# Altium PCB Telephone Circuit v1.0.PcbDoc (part 1 of 5)
Units mil, origin at the board's own origin, x right, y up, seen from the top; angles counter-clockwise.
Board outline 3149.61 x 2952.76 mil, 2 copper layers (Top Layer, Bottom Layer), stack 61.855 mil thick; 194 components, 119 nets, 557 pads, 213 vias.
Unrouted connection lines stored in the file: 77.
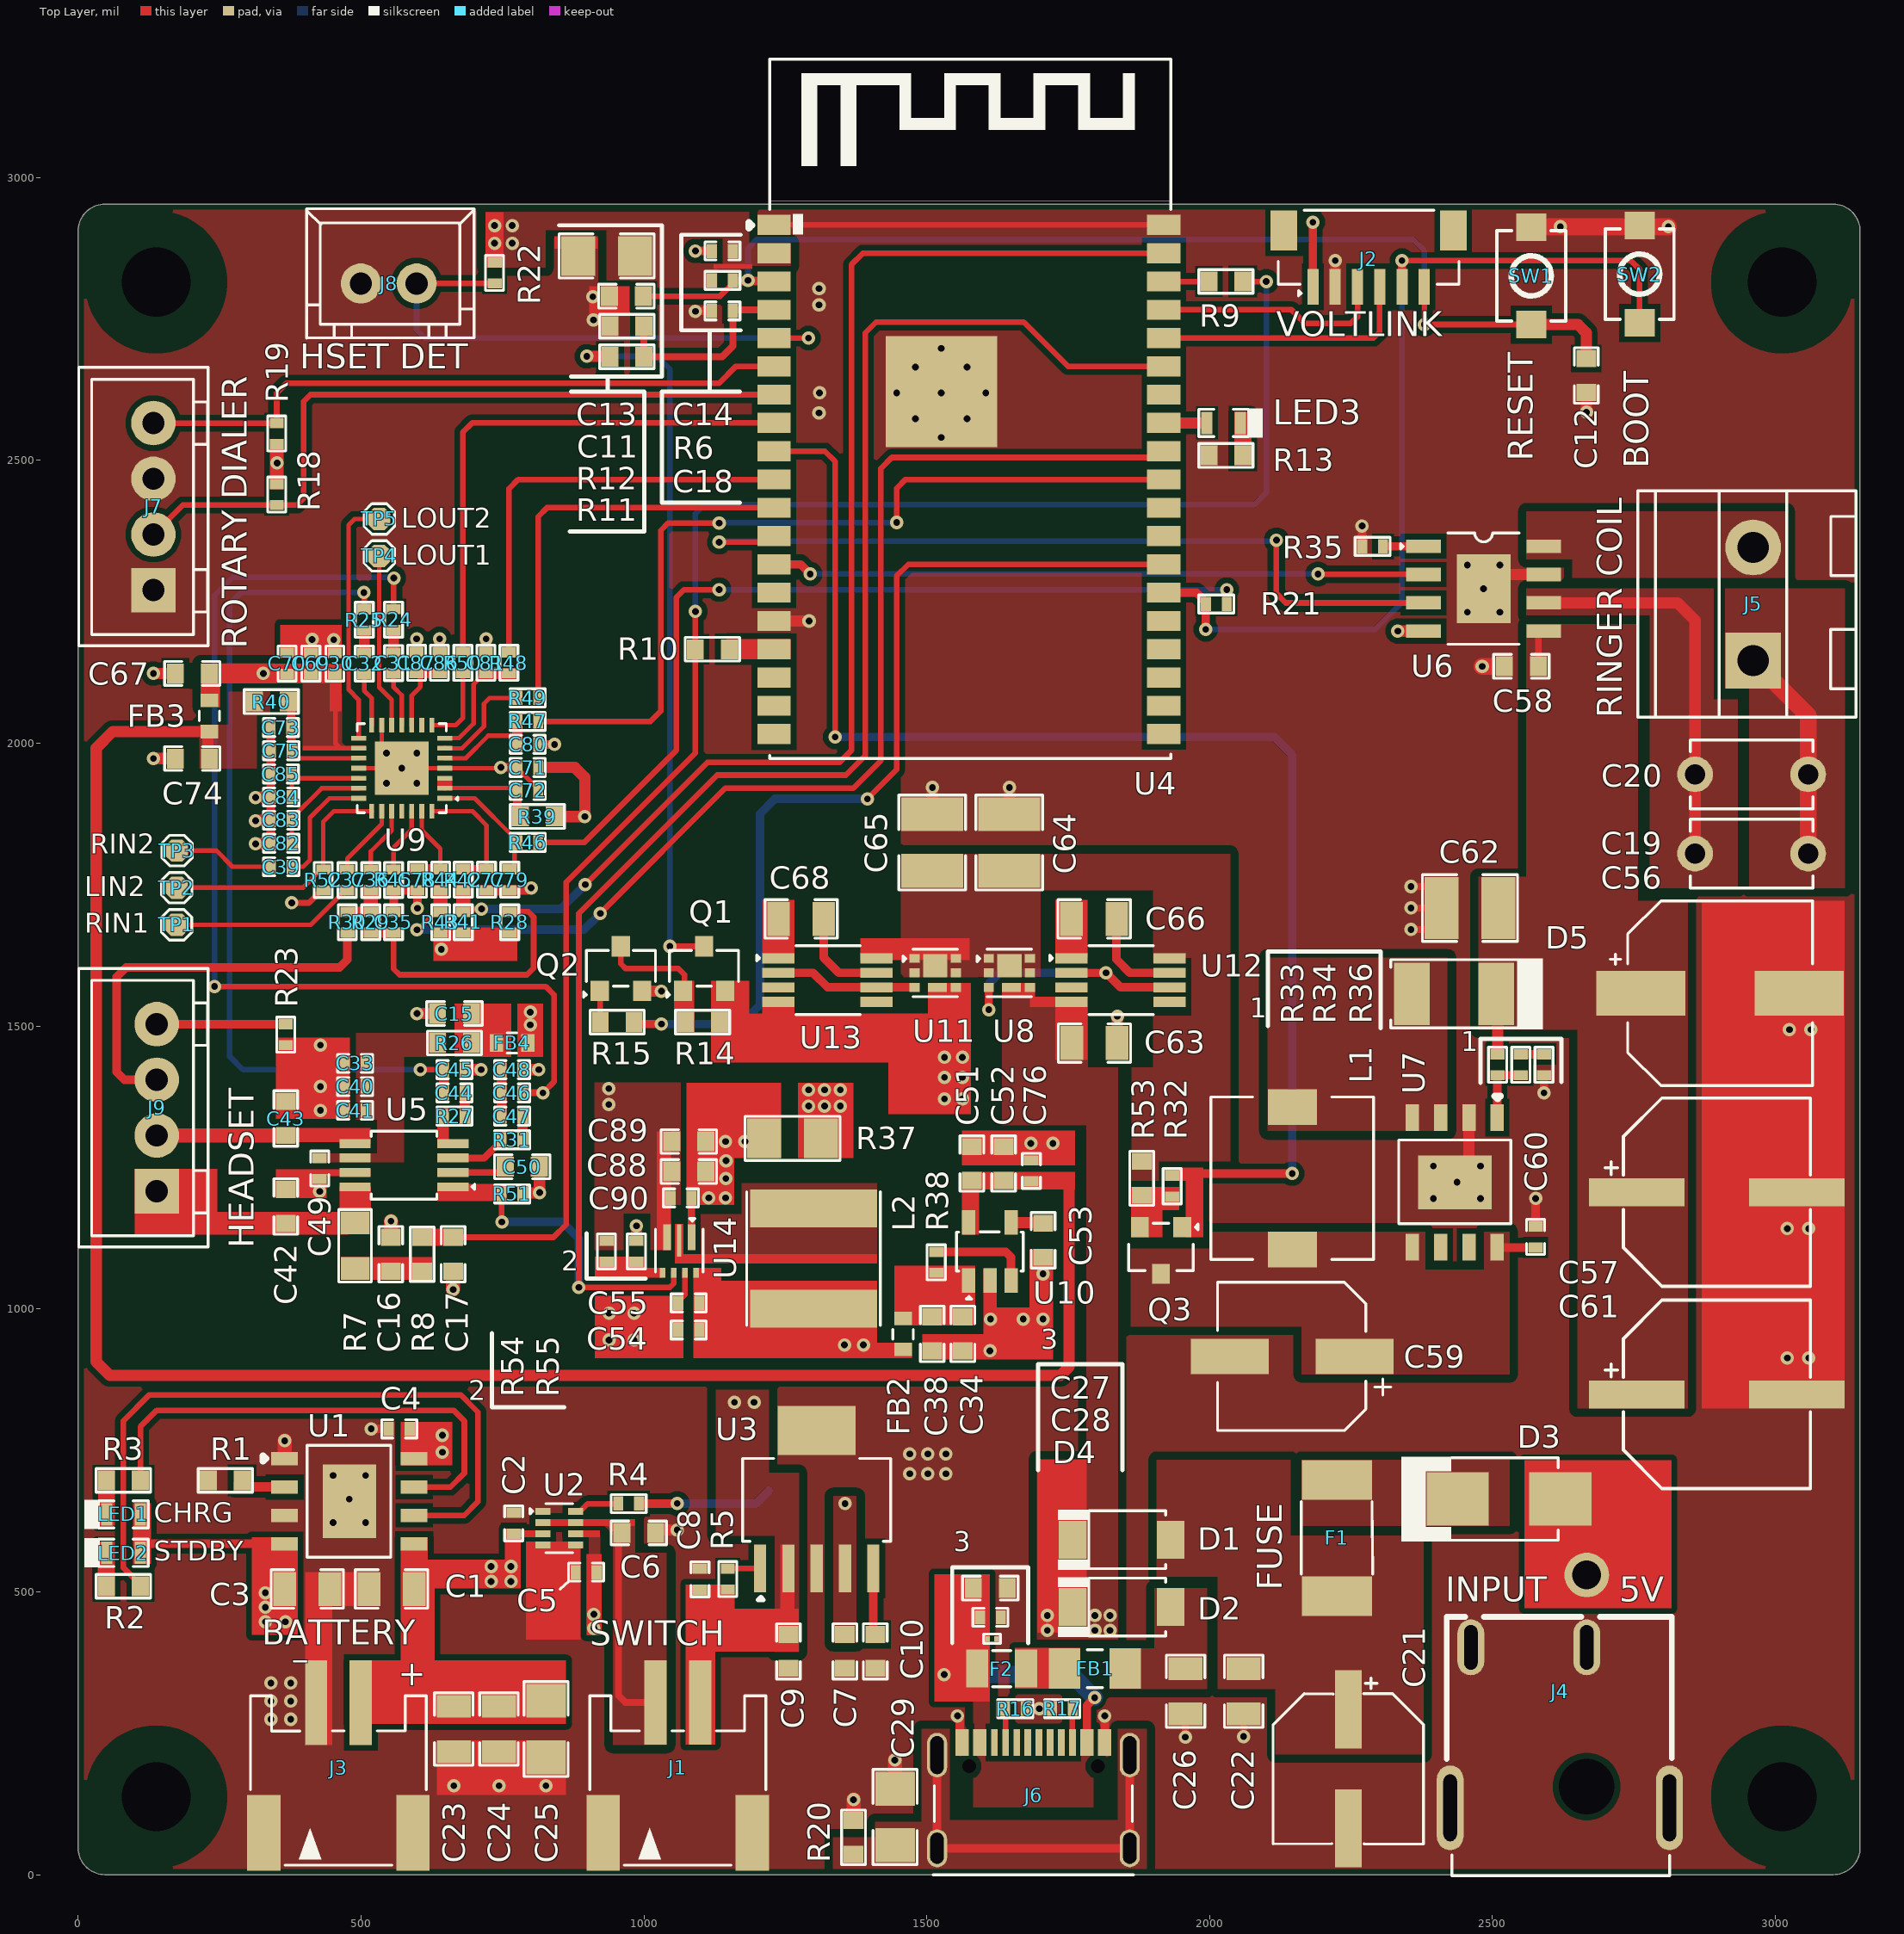
[diagram p0: Top Layer view]
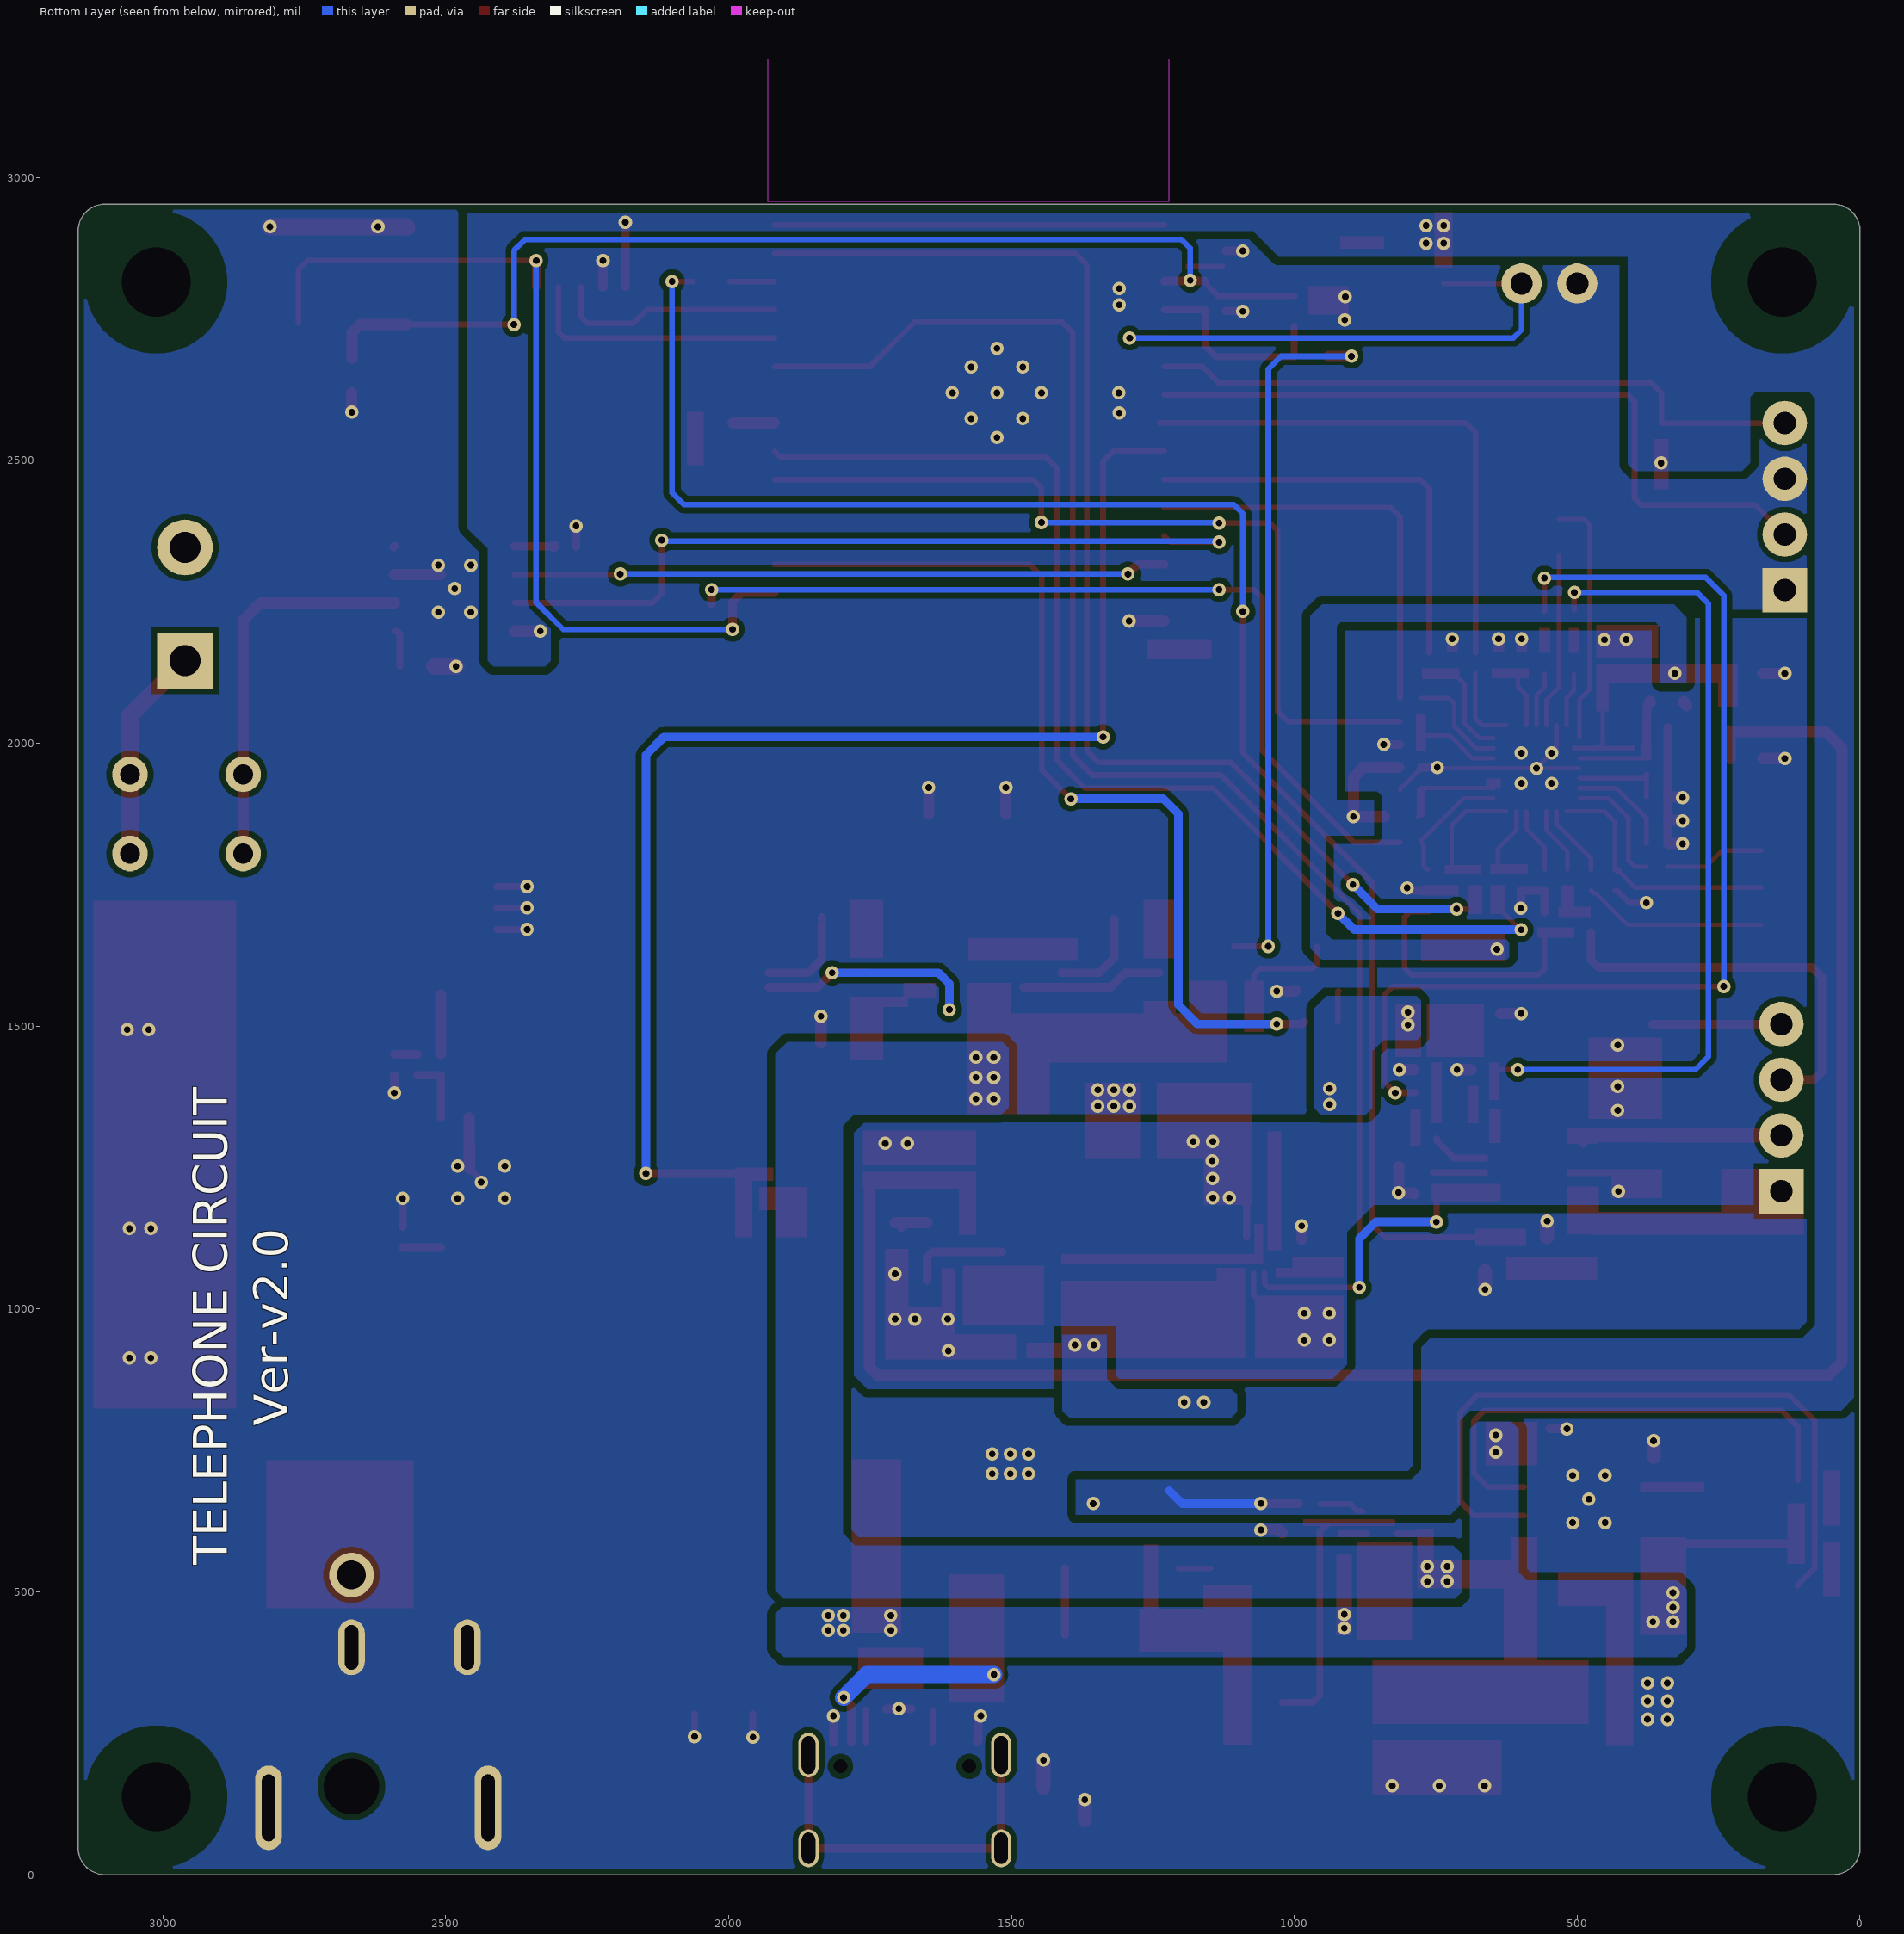
[diagram p1: Bottom Layer view, seen from below]
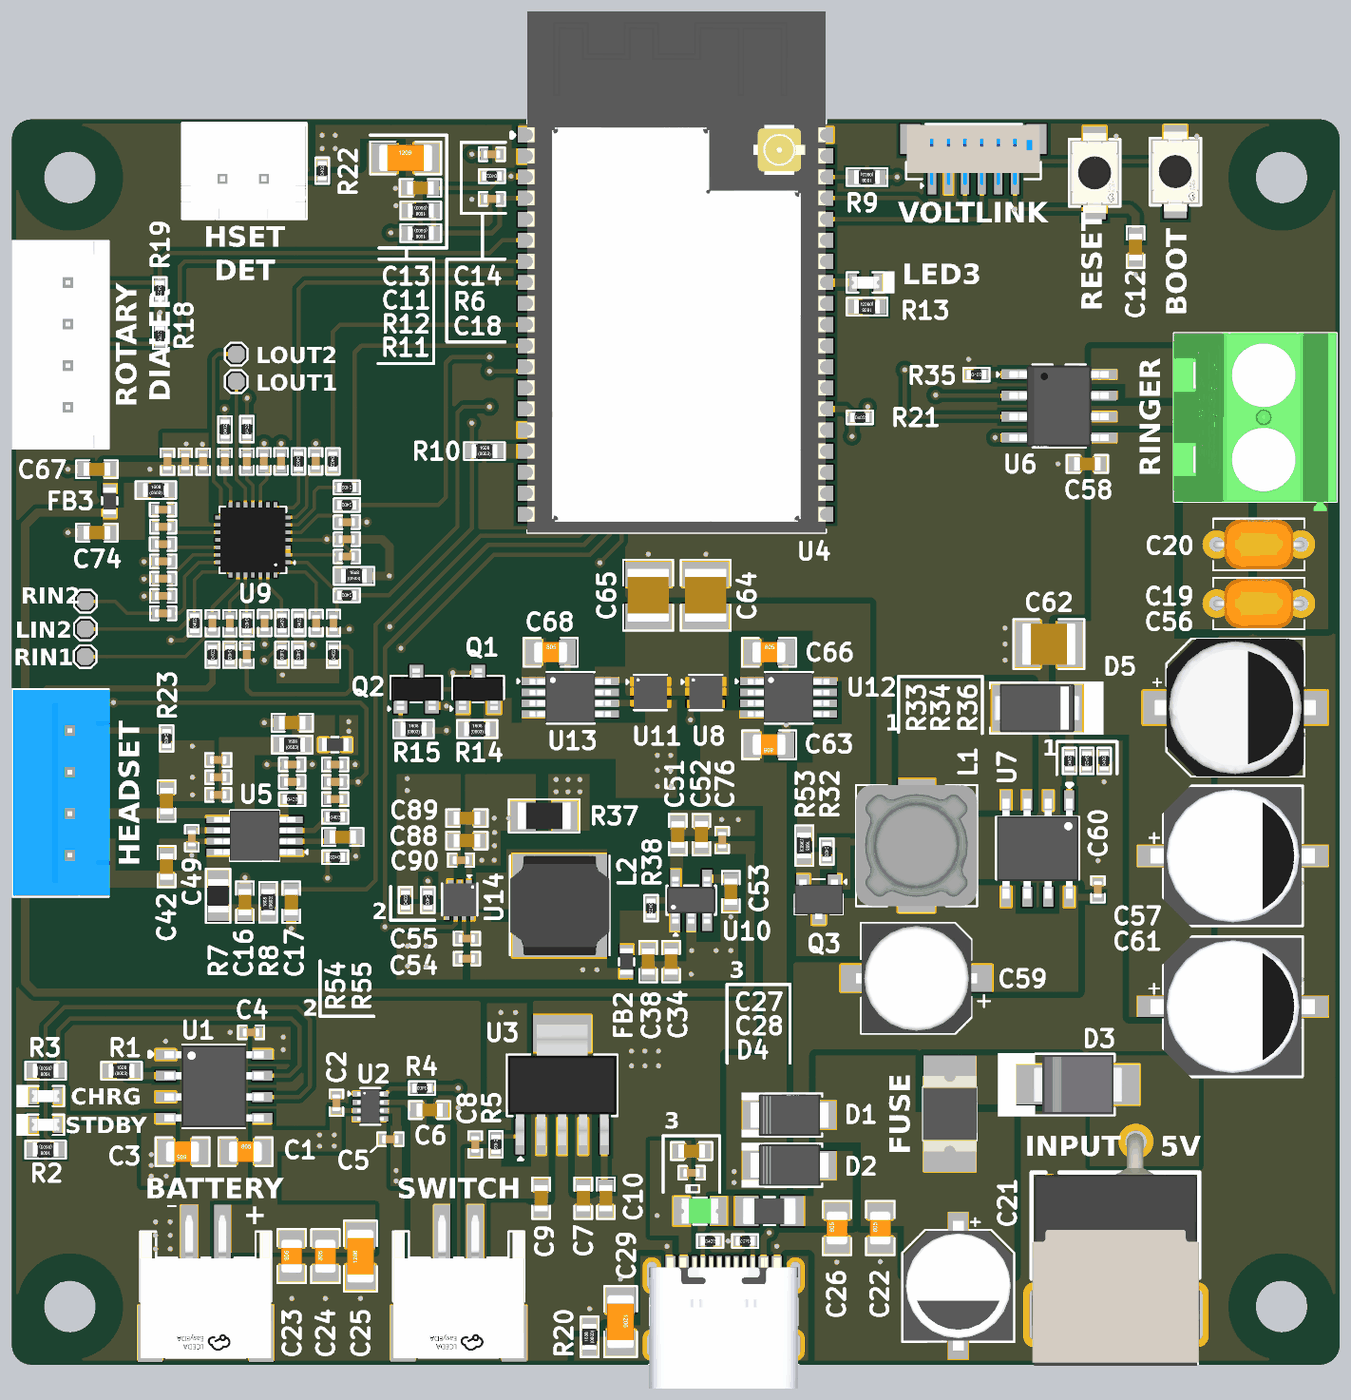
[diagram p4: 3D render of the assembled board from above, using the file's embedded part models]

## Layer stack, top to bottom
Top Solder: solder mask 0.4, Solder Resist, Dk 3.5
Top Layer: signal copper 1.4
Dielectric 1: dielectric 59.0551, FR-4, Dk 4.8
Bottom Layer: signal copper 1.4
Bottom Solder: solder mask 0.4, Solder Resist, Dk 3.5

## Board outline
0,47.24 0,2905.51 cw(c47.24,2905.51) 47.24,2952.76 3102.36,2952.76 cw(c3102.36,2905.51) 3149.61,2905.51 3149.61,47.24 cw(c3102.36,47.24) 3102.36,0 47.24,0 cw(c47.24,47.24)

## Design rules (kind name [scope] priority, off if disabled: settings)
BoardOutlineClearance [All] p1: gap=0 ignorepadtopadclearanceinfootprint=FALSE except(10: Poly-OutlineEdge)
Clearance [All] p1: gap=10 ignorepadtopadclearanceinfootprint=TRUE except(6: Track-SMDPad; 7: Arc-Track Arc-SMDPad Arc-Fill Track-Track Track-Fill SMDPad-SMDPad SMDPad-Fill Via-Fill Fill-Fill; 15: Poly-Poly; 20: Poly-Region)
ComponentClearance [All] p1: gap=0 collisioncheckmode=3 verticalgap=0 showdistances=FALSE
HoleSize [All] p1: absolutevalues=TRUE maxlimit=150 minlimit=1 maxpercent=80.000 minpercent=20.000
MinimumSolderMaskSliver [All] p1: minsoldermaskwidth=0
PolygonConnect [All] p1: connectstyle=Direct reliefconductorwidth=10 reliefentries=4 polygonreliefangle="90 Angle" airgapwidth=10
RoutingVias [All] p1: holewidth=11.81 width=23.62 viastyle="Through Hole" minholewidth=11.81 minwidth=23.62 maxholewidth=11.81 maxwidth=23.62
SilkToSilkClearance [All] p1: silktosilkclearance=0
SilkToSolderMaskClearance [IsPad] p1: minsilkscreentomaskgap=0 clearancetoexposedcopper=TRUE
SolderMaskExpansion [All] p1: expansion=4 istentingtop=FALSE
SupplyNets "Schematic Supply Nets_15" [InNet('AGND')] p1: voltage=0.000
SupplyNets "Schematic Supply Nets_14" [InNet('DC_Barrel_5V')] p2: voltage=0.000
SupplyNets "Schematic Supply Nets_13" [InNet('V_OR')] p3: voltage=0.000
SupplyNets "Schematic Supply Nets_12" [InNet('GND')] p4: voltage=0.000
SupplyNets "Schematic Supply Nets_11" [InNet('VUSB')] p5: voltage=0.000
SupplyNets "Schematic Supply Nets_10" [InNet('BATT')] p6: voltage=0.000
SupplyNets "Schematic Supply Nets_9" [InNet('5V_BOOST#')] p7: voltage=0.000
SupplyNets "Schematic Supply Nets_8" [InNet('V_MON')] p8: voltage=0.000
SupplyNets "Schematic Supply Nets_7" [InNet('Coil power_42V')] p9: voltage=0.000
SupplyNets "Schematic Supply Nets_6" [InNet('3.3V##')] p10: voltage=0.000
SupplyNets "Schematic Supply Nets_5" [InNet('LDO_INPUT')] p11: voltage=0.000
SupplyNets "Schematic Supply Nets_4" [InNet('5V')] p12: voltage=0.000
SupplyNets "Schematic Supply Nets_3" [InNet('5V_BOOST')] p13: voltage=0.000
SupplyNets "Schematic Supply Nets_2" [InNet('3V3')] p14: voltage=0.000
SupplyNets "Schematic Supply Nets_1" [InNet('VBUS')] p15: voltage=0.000
SupplyNets "Schematic Supply Nets" [InNet('3V3#')] p16: voltage=0.000
Width [All] p1: maxlimit=50 minlimit=8 preferedwidth=12 minimp=50.000000 maximp=50.000000 favimp=50.000000
25 further rules are at their usual default settings.

## Classes and differential pairs
component class Ringer_Sheet: C56 C57 C58 C59 C60 C61 C62 C63 C64 C65 C66 C68 D5 L1 Q3 R32 R33 R34 R35 R36 R53 U6 U7 U8 U11 U12 U13
component class Power_Sheet: C1 C2 C3 C4 C5 C6 C7 C8 C9 C10 D1 D2 J1 LED1 LED2 R1 R2 R3 R4 R5 U1 U2 U3
component class Controller_Sheet: BOOT C11 C12 C13 C14 C16 C17 C18 J2 LED3 Q1 Q2 R6 R7 R8 R9 R10 R11 R12 R13 R14 R15 R21 RESET SW1 SW2 U4
component class Connector_Sheet: C19 C20 C21 C22 C23 C24 C25 C26 C27 C28 C29 D3 D4 F1 F2 FB1 J3 J4 J5 J6 J7 J8 J9 R16 R17 R18 R19 R20 R22 R23
component class "Audio Codec_Sheet": C30 C31 C32 C34 C35 C36 C37 C38 C39 C51 C52 C53 C67 C69 C70 C71 C72 C73 C74 C75 C76 C77 C78 C79 C80 C81 C82 C83 C84 C85 C86 C87 FB2 FB3 R24 R25 R28 R29 R30 R37 R38 R39 R40 R41 R42 R43 R44 R45 R46 R47 R48 R49 R50 R52 TP1 TP2 TP3 TP4 TP5 U9 U10
component class "Audio Amplifier_Sheet": C15 C33 C40 C41 C42 C43 C44 C45 C46 C47 C48 C49 C50 C54 C55 C88 C89 C90 FB4 L2 R26 R27 R31 R51 R54 R55 U5 U14

## Components (designator, comment, footprint, x,y, rotation, side; value= is the part's Value field where it differs from the comment)
C1 "10uF" Cap-0805 554,505 r0 top
C2 "100nF" Cap-0402 769.88,621.08 r270 top
C3 "10uF" Cap-0805 404.98,505 r180 top
C4 "100nF" Cap-0402 567.5,788 r0 top
C5 "100nF" Cap-0402 897.85,534.7 r0 top
C6 "1uF" Cap-0603 991,604 r180 top
C7 "22uF" Cap-0603 1355.36,394.62 r90 top
C8 "2.2uF" Cap-0402 1099.26,522.2 r270 top
C9 "10uF" Cap-0603 1255.36,394.61 r90 top
C10 "10nF" Cap-0603 1408.95,394.61 r90 top
C11 "1uF" Cap-0603 969,2790.15 r0 top
C12 "100nF" Cap-0603 2665.63,2649.96 r90 top
C13 "100uF" Cap-1206 934,2861.43 r0 top
C14 "100nF" Cap-0402 1138.75,2870.15 r0 top
C15 "1uF" Cap-0603 665.12,1522.16 r0 top
C16 "100nF" Cap-0603 552.67,1096.7 r270 top
C17 "100nF" Cap-0603 662.61,1096.7 r90 top
C18 "100nF" Cap-0402 1138.75,2764.15 r0 top
C19 "2.2uF" CD2A225KC9BER1F100 2957.96,1804.88 r0 top
C20 "1uF" CD2E105KC1IER1I100 2957.96,1944.88 r0 top
C21 "220uF" 189RV0019 2245,187 r270 top
C22 "1uF" Cap-0805 2060,324.12 r90 top
C23 "10uF" Cap-0805 663.86,257.4 r90 top
C24 "10uF" Cap-0805 743.86,257.4 r90 top
C25 "100uF" Cap-1206 827,257.41 r90 top
C26 "10uF" Cap-0805 1957.48,324.12 r90 top
C27 "10nF" Cap-0603 1612.35,506.46 r0 top
C28 "1uF" Cap-0402 1612.35,455 r0 top
C29 "4.7nF" Cap-1206 1443.95,102.05 r270 top
C30 "100nF" Cap-0402 453.67,2141.02 r270 top
C31 "22uF" Cap-0402 557.66,2141.52 r90 top
C32 "22uF" Cap-0402 505.67,2141.02 r90 top
C33 "10uF" Cap-0402 489.53,1434.02 r180 top
C34 "0.1uF" Cap-0603 1563.8,955.87 r90 top
C35 "10uF" Cap-0402 557.67,1683.52 r270 top
C36 "1uF" Cap-0402 517.19,1758.08 r90 top
C37 "1uF" Cap-0402 475.58,1758.08 r90 top
C38 "10uF" Cap-0603 1509.56,955.87 r90 top
C39 "1uF" Cap-0402 359,1781.58 r0 top
C40 "1uF" Cap-0402 489.53,1393.02 r180 top
C41 "100nF" Cap-0402 489.53,1351.02 r180 top
C42 "330pF" Cap-0603 367,1181.1 r90 top
C43 "330pF" Cap-0603 366.99,1336.59 r90 top
C44 "100nF" Cap-0402 665.12,1381.99 r180 top
C45 "39pF" Cap-0402 665.1,1422.99 r180 top
C46 "22uF" Cap-0402 766.99,1382 r180 top
C47 "100nF" Cap-0402 767,1341 r180 top
C48 "39pF" Cap-0402 766.98,1423 r180 top
C49 "1uF" Cap-0402 427,1248.2 r90 top
C50 "1uF" Cap-0603 785,1251.2 r180 top
C51 "0.1uF" Cap-0603 1579.82,1256.95 r270 top
C52 "10uF" Cap-0603 1635.82,1256.96 r270 top
C53 "22nF" Cap-0603 1705.56,1121.44 r90 top
C54 "10uF" Cap-0402 1079.3,962.84 r0 top
C55 "100nF" Cap-0402 1079.3,1010.52 r0 top
C56 "47uF" EEEFN1K470UP 2902.15,1558 r0 top
C57 "100uF" VKMD1451K101MV 2754.81,1206.39 r0 top
C58 "0.1uF" Cap-0603 2551,2135.85 r0 top
C59 "330uF" GVT1C331M0607 2146,916 r180 top
C60 "4.7uF" Cap-0402 2576.21,1127.12 r270 top
C61 "100uF" VKMD1451K101MV 2754.81,848.89 r0 top
C62 "10uF" Cap-1210 2460,1708.64 r0 top
C63 "100pF" Cap-0805 1796.41,1470 r180 top
C64 "10uF" Cap-1210 1645.87,1824.45 r270 top
C65 "10uF" Cap-1210 1509.56,1824.45 r270 top
C66 "2.2uF" Cap-0805 1795.77,1689.24 r0 top
C67 "4.7uF" Cap-0603 201.73,2123.35 r0 top
C68 "2.2uF" Cap-0805 1277.98,1689.24 r0 top
C69 "100nF" Cap-0402 411.28,2141.02 r270 top
C70 "100nF" Cap-0402 369.28,2141.02 r270 top
C71 "10uF" Cap-0402 794.64,1957.23 r0 top
C72 "100nF" Cap-0402 794.64,1916.36 r180 top
C73 "10uF" Cap-0402 358.52,2027.68 r180 top
C74 "10uF" Cap-0603 201.73,1972.93 r180 top
C75 "100nF" Cap-0402 359.01,1986.9 r180 top
C76 "100nF" Cap-0402 1684.82,1243.96 r90 top
C77 "20pF" Cap-0402 721.81,1758.55 r90 top
C78 "20pF" Cap-0402 599.62,1758.54 r90 top
C79 "20pF" Cap-0402 762.92,1758.51 r90 top
C80 "20pF" Cap-0402 794.64,1997.88 r180 top
C81 "20pF" Cap-0402 720.66,2142.03 r270 top
C82 "10uF" Cap-0402 359,1823 r0 top
C83 "100nF" Cap-0402 359,1863.93 r0 top
C84 "10uF" Cap-0402 359,1904.87 r0 top
C85 "100nF" Cap-0402 358.52,1945.8 r0 top
C86 "10uF" Cap-0402 638.66,2142.03 r270 top
C87 "100nF" Cap-0402 598.1,2142.03 r270 top
C88 "22uF" Cap-0603 1079.41,1242.89 r180 top
C89 "22uF" Cap-0603 1079.41,1296 r180 top
C90 "100nF" Cap-0402 1065.41,1196.37 r180 top
D1 "PMEG3030EP,115" SOD-128 1844.39,592 r0 top value=470pF
D2 "PMEG3030EP,115" SOD-128 1844.39,473 r0 top value=470pF
D3 "SS510B" SMB_ 2529,664 r180 top
D4 "PESD5V0H1BSFYL" DSN0603-2 1615.35,417.12 r0 top
D5 "SS26" SMA(DO-214AC) 2432,1557 r180 top
F1 "BSMD1812-260-13.2V" 1812-FUSE 2225,595 r270 top
F2 "BSMD0805L-200" Fuse-0805 1632.3,364.12 r0 top
FB1 "100MHz" IND-1206 1797.14,364.12 r0 top
FB2 "BLM18SG121TN1D" "IND-0603 (1608 Metric)" 1458,955.87 r270 top
FB3 "BLM18SG121TN1D" "IND-0603 (1608 Metric)" 231.96,2048.09 r90 top
FB4 "BLM18PG181SN1D" "IND-0603 (1608 Metric)" 767,1470.16 r180 top
J1 "S2B-PH-SM4-TB(LF)(SN)" S2B-PH-SM4-TB(LF)(SN) 1059.89,189.16 r0 top locked
J2 "Voltlink Target" "Voltlink Target" 2280.91,2856.4 r0 top
J3 "S2B-PH-SM4-TB(LF)(SN)" S2B-PH-SM4-TB(LF)(SN) 460,189 r0 top locked
J4 "DC-044K-D025" DC-044K-D025 2619,324 r90 top
J5 "1715721" 1715721 2960.66,2246.06 r90 top
J6 "TYPE-C-31-M-12" TYPE-C-31-M-12_ 1688.48,140.12 r0 top locked
J7 "XH-4A" XH-4A 133,2418.21 r90 top
J8 "XH-2A-L" XH-2A-L 549.01,2812.69 r0 top locked
J9 "XH-4A-L" XH-4A-L 139,1355.79 r90 top locked
L1 "4.7uH" YPRH0704-4R7M 2146,1231 r270 top
L2 "1uH" MPIT6045-1R0N-LF 1299.79,1088.85 r90 top
LED1 "RED" LED-0603 80,636.82 r180 top
LED2 "Emerald" LED-0603 80,568.82 r180 top
LED3 "RED" LED-0603 2024.69,2566.15 r0 top
Q1 "AO3407" SOT-23 1106.31,1601.5 r0 top
Q2 "MMBT2222A-7-F" SOT-23 959.28,1601.5 r0 top
Q3 "SSM3J328R,LF" SOT-23F 1914,1103.34 r180 top
R1 "1.2K" Res-0603 260,696.81 r180 top value=1.2kΩ
R2 "330R" Res-0603 80,509.82 r0 top
R3 "330R" Res-0603 80,696.82 r0 top
R4 "10K" Res-0402 973,655.85 r180 top
R5 "10K" Res-0402 1148.21,522.6 r270 top
R6 "10K" Res-0402 1138.75,2818.15 r180 top
R7 "10K" RES-0805 489.39,1111.7 r90 top
R8 "1K" Res-0603 608,1096.7 r270 top value=1kR
R9 "1K" Res-0603 2028.69,2816.15 r0 top value=1kR
R10 "1K" Res-0603 1121,2166.15 r180 top value=1kR
R11 "100K" Res-0603 970,2683.17 r0 top
R12 "270K" Res-0603 970,2737 r0 top value=270kR
R13 "100R" Res-0603 2028.69,2508.76 r0 top
R14 "1K" Res-0603 1103.71,1507.13 r180 top
R15 "1K" Res-0603 952.78,1507.13 r180 top
R16 "5.1K" Res-0402 1656.48,293.12 r0 top
R17 "5.1K" Res-0402 1739.5,293.12 r180 top
R18 "10K" Res-0402 351.01,2439.58 r90 top
R19 "10K" Res-0402 351.01,2547.35 r270 top
R20 "1M" Res-0603 1370.51,66.05 r270 top
R21 "0R" Res-0402 2011.69,2246.15 r0 top
R22 "10K" Res-0402 736,2831.19 r90 top
R23 "0R" Res-0402 366.99,1484.93 r270 top
R24 "33R" Res-0402 557.66,2218.53 r90 top
R25 "33R" Res-0402 505.67,2218.03 r90 top
R26 "10R" Res-0603 665.14,1470.16 r180 top
R27 "30K" Res-0402 665.11,1341.01 r0 top value=30kR
R28 "1K" Res-0402 762.92,1683.52 r90 top
R29 "2K" Res-0402 517.18,1683.52 r270 top value=2kR
R30 "0R" Res-0402 475.85,1683.52 r90 top
R31 "30K" Res-0402 767,1299 r0 top value=30kR
R32 "10K" Res-0402 1933.55,1216.82 r270 top
R33 "240K" Res-0402 2508.98,1431.65 r90 top
R34 "6.2K" Res-0402 2550.09,1431.65 r270 top value=6.2kR
R35 "1.3K" Res-0402 2288,2347.85 r0 top
R36 "806R" Res-0402 2590.87,1431.65 r90 top
R37 "0R" Res-1206 1262.67,1301.41 r180 top value=0mR
R38 "1K" Res-0402 1516.56,1082.44 r270 top
R39 "47R" Res-0603 811.64,1870.36 r180 top
R40 "4.7R" Res-0603 341.52,2073.51 r180 top
R41 "2K" Res-0402 680.66,1683.52 r270 top value=2kR
R42 "100R" Res-0402 680.66,1758.53 r90 top
R43 "2K" Res-0402 640.77,1683.52 r270 top value=2kR
R44 "100R" Res-0402 640.77,1758.51 r90 top
R45 "10K" Res-0402 557.67,1758.1 r270 top
R46 "33R" Res-0402 794.64,1824.45 r180 top
R47 "33R" Res-0402 794.64,2038.54 r180 top
R48 "33R" Res-0402 761.4,2142.04 r270 top
R49 "33R" Res-0402 794.66,2080.03 r180 top
R50 "33R" Res-0402 679.83,2142.04 r270 top
R51 "10K" Res-0402 766.99,1203.26 r180 top
R52 "100K" Res-0402 433.27,1758.09 r90 top
R53 "0R" Res-0603 1879.91,1230.83 r90 top
R54 "732K" Res-0402 933.78,1101.84 r90 top
R55 "100K" Res-0402 986.78,1101.84 r270 top
SW1 "TS-1088-AR02016" TS-1088-AR02016 2568.4,2826.15 r270 top
SW2 "TS-1088-AR02016" TS-1088-AR02016 2760,2829.09 r270 top
TP1 "TEST POINT 0.5mm Dia" "TEST-POINT - 0.5MM" 174,1679.02 r270 top
TP2 "TEST POINT 0.5mm Dia" "TEST-POINT - 0.5MM" 174.31,1744.62 r270 top
TP3 "TEST POINT 0.5mm Dia" "TEST-POINT - 0.5MM" 174.63,1810.22 r270 top
TP4 "TEST POINT 0.5mm Dia" "TEST-POINT - 0.5MM" 532.14,2331.15 r270 top
TP5 "TEST POINT 0.5mm Dia" "TEST-POINT - 0.5MM" 532.14,2396.4 r270 top
U1 "TP4056-42-ESOP8" ESOP-8 479.49,660 r0 top locked
U2 "LM66200DRLR" SOT-583 850.39,612.43 r0 top locked
U3 "TPS79633DCQR" SOT-223-6_ 1305.36,663.15 r0 top
U4 "ESP32-WROVER-E-N16R8" ESP32-WROVER-E-N16R8 1574.51,2466.15 r0 top locked
U5 "NS4150B" "8-MSOP (0.118\", 3.00mm Width)" 576,1254 r180 top locked
U6 "DRV8251ADDAR" SOPowerPAD(DDA)-8 2484.21,2273.19 r0 top
U7 "LGS6302EP" ESOP-8 2433.3,1223.72 r270 top
U8 "CSD17313Q2" CSD17313Q2 1646,1594.06 r0 top
U9 "ES8388" QFN-28-EP(4x4) 571.91,1955.79 r180 top locked
U10 "RT9193-33GB" SOT-23-5 1611.56,1101.44 r90 top
U11 "CSD17313Q2" CSD17313Q2 1514.91,1594.06 r0 top
U12 "LM74610QDGKRQ1" "8-VSSOP (5x3.1mm)" 1842.39,1581.27 r0 top
U13 "LM74610QDGKRQ1" "8-VSSOP (5x3.1mm)" 1324.59,1581.27 r0 top
U14 "TPS61022RWUR" "7-VQFN-HR (2x2)" 1062.47,1095.21 r270 top

## Footprints (in the part's own frame and the unit in brackets; to place one, negate y for a bottom-side part, rotate by r counter-clockwise, add the part's x,y. Pads: shape width x height; smd on the part's side, far side on the other; paste and mask are expansions set on the pad)
"7-VQFN-HR (2x2)" [mm]
  rect 1.15x0.35 smd: 1(-0.8,0.55) 3(-0.8,-0.55)
  rect 1.45x0.2 smd: 2(-0.65,0)
  rect 0.45x0.25 smd: 4(0.8,-0.75) 5(0.8,-0.25) 6(0.8,0.25) 7(0.8,0.75)
  silkscreen extent -1.65,-1.07 0.76,1.07, body extent -1.18,-1 0.82,1, height 1
"8-MSOP (0.118\", 3.00mm Width)" [mm]
  rect 1.4x0.4 smd: 1(-2.2,0.975) 2(-2.2,0.325) 3(-2.2,-0.325) 4(-2.2,-0.975) 5(2.2,-0.975) 6(2.2,-0.325) 7(2.2,0.325) 8(2.2,0.975)
  silkscreen extent -3.17,-1.52 1.47,1.52, body extent -2.45,-1.5 2.45,1.5, height 1.1
"8-VSSOP (5x3.1mm)" [mm]
  rect 1.45x0.45 smd mask+0.05: 1(-2.2,0.975) 2(-2.2,0.325) 3(-2.2,-0.325) 4(-2.2,-0.975) 5(2.2,-0.975) 6(2.2,-0.325) 7(2.2,0.325) 8(2.2,0.975)
  silkscreen extent -3.17,-1.55 1.47,1.55, body extent -2.45,-1.5 2.45,1.5, height 1.1
189RV0019 [mm]
  rect 3.5x1.2 smd paste+0 mask+0.051: 1(-2.67,0) 2(2.67,0)
  silkscreen extent -4.07,-3.38 3.38,3.38, body extent -3.9,-3.3 3.9,3.3, height 7.75
1812-FUSE [mm] "13.2V 2.6A 40A 800mW -40?~+85? 5.2A 10mO 2.5s 50mO 1812 Resettable Fuses ROHS"
  rect 1.78x3.15 smd mask+0.05: 1(-2.615,0) 2(2.615,0)
  silkscreen extent -1.63,-1.6 1.63,1.6, body extent -2.27,-1.62 2.27,1.62, height 0.85
1715721 [mm]
  rect 2.5x2.5 hole 1.4 paste-2539.97 mask+0.051: 1(-2.54,0)
  round 2.5 hole 1.4 paste-2539.97 mask+0.051: 2(2.54,0)
  silkscreen extent -5.08,-4.62 5.08,5.18, body extent -5.64,-4.62 5.09,5.21, height 15.2
Cap-0402 [mil]
  rect 18x25 smd mask+2.36: 1(-18.5,0) 2(18.5,0)
  silkscreen extent -31,-16 31,16, body extent -20,-10 20,10, height 19
Cap-0603 [mil]
  rect 30x35 smd mask+2.36: 1(-30,0) 2(30,0)
  silkscreen extent -49,-21 49,21, body extent -32,-16 31,16, height 34
Cap-0805 [mil] "SMD 0805"
  rect 40x60 smd mask+2.76: 1(-40,0) 2(40,0)
  silkscreen extent -64,-34 64,34, body extent -39,-25 39,25, height 30
Cap-1206 [mil] "SMD 1206"
  rect 60x70 smd: 1(-50,0) 2(50,0)
  silkscreen extent -84,-39 84,39, body extent -63,-31 63,32, height 39
Cap-1210 [mil] "SMD 1210"
  rect 60x110 smd: 1(-50,0) 2(50,0)
  silkscreen extent -84,-59 84,59, body extent -63,-49 63,49, height 39
CD2A225KC9BER1F100 [mm]
  round 1.6 hole 0.9 paste-2539.97 mask+0.051: 1(-2.54,0) 2(2.54,0)
  silkscreen extent -2.75,-1.55 2.75,1.55, body extent -2.74,-1.5 2.74,1.5, height 5.5
CD2E105KC1IER1I100 [mm]
  round 1.6 hole 0.9 paste-2539.97 mask+0.051: 1(-2.54,0) 2(2.54,0)
  silkscreen extent -2.75,-1.55 2.75,1.55, body extent -2.74,-1.5 2.74,1.5, height 5.5
CSD17313Q2 [mm] "6-WSON (2x2)"
  rect 0.455x0.4 smd paste-1: 1(-0.923,0.65) 2(-0.923,0) 3(-0.923,-0.65) 4(0.923,-0.65) 5(0.923,0) 6(0.923,0.65)
  rect 0.85x0.4 smd paste-0.05: 7(0.096,-0.65)
  rect 1.1x1.05 smd paste-0.05: 8(0,0.325)
  silkscreen extent -1.45,-1.07 1,1.07, body extent -1,-1 1,1, height 0.8
DC-044K-D025 [mm]
  oval 3.8x1.2 hole 0.6 slot 3 at 0 deg copper offset 0,0 paste-2539.97 mask+0.051: 1(-5.225,4.925)
  oval 2.5x1.2 hole 0.6 slot 2 at 0 deg copper offset 0,0.001 paste-2539.97 mask+0.051: 2(1.975,3.996)
  oval 2.5x1.2 hole 0.6 slot 2 at 0 deg copper offset 0,-0.001 paste-2539.97 mask+0.051: 3(1.975,-1.206)
  round 2 hole 1.3 paste-2539.97 mask+0.051: 4(5.225,-1.205)
  oval 3.8x1.2 hole 0.6 slot 3 at 0 deg paste-2539.97 mask+0.051: 6(-5.225,-4.925)
  round 0 hole 2.5 unplated paste-2539.97 mask+0.051: MH(-4.275,-1.205)
  silkscreen extent -8.27,-5.02 3.35,5.08, body extent -8.3,-5.03 5.7,5.07, height 7.3
DSN0603-2 [mm]
  rect 0.2x0.24 smd mask+0.055: 1(-0.2,0) 2(0.2,0)
  silkscreen extent -0.38,-0.2 0.38,0.2, body extent -0.3,-0.15 0.3,0.15, height 0.32
EEEFN1K470UP [mm]
  rect 4x2 smd: 1(-3.55,0) 2(3.55,0)
  silkscreen extent -4.93,-4.15 4.15,4.15, body extent -4.85,-4.15 4.85,4.15, height 10.2
ESOP-8 [mm]
  rect 1.2x0.6 smd: 1(-2.909,1.905) 2(-2.909,0.635) 3(-2.909,-0.635) 4(-2.909,-1.905) 5(2.909,-1.905) 6(2.909,-0.635) 7(2.909,0.635) 8(2.909,1.905)
  rect 2.4x3.3 smd: 9(0,0)
  silkscreen extent -3.88,-2.51 1.85,2.51, body extent -3,-2.45 3,2.45, height 1.75
ESP32-WROVER-E-N16R8 [mm]
  rect 1.5x0.9 smd: 1(-8.75,11.43) 2(-8.75,10.16) 3(-8.75,8.89) 4(-8.75,7.62) 5(-8.75,6.35) 6(-8.75,5.08) 7(-8.75,3.81) 8(-8.75,2.54) 9(-8.75,1.27) 10(-8.75,0) 11(-8.75,-1.27) 12(-8.75,-2.54) 13(-8.75,-3.81) 14(-8.75,-5.08) 15(-8.75,-6.35) 16(-8.75,-7.62) 17(-8.75,-8.89) 18(-8.75,-10.16) 19(-8.75,-11.43) 20(8.75,-11.43) 21(8.75,-10.16) 22(8.75,-8.89) 23(8.75,-7.62) 24(8.75,-6.35) 25(8.75,-5.08) 26(8.75,-3.81) 27(8.75,-2.54) 28(8.75,-1.27) 29(8.75,0) 30(8.75,1.27) 31(8.75,2.54) 32(8.75,3.81) 33(8.75,5.08) 34(8.75,6.35) 35(8.75,7.62) 36(8.75,8.89) 37(8.75,10.16) 38(8.75,11.43)
  rect 5x5 smd: 39(-1.241,3.945)
  Keep-Out Layer region: 9.06,12.501 -8.97,12.501 -8.97,18.87 9.06,18.87
  silkscreen extent -9.88,-12.53 9.06,18.87, body extent -8.95,-12.52 9.05,18.87, height 3.65
Fuse-0805 [mm]
  rect 1x1.7 smd: 1(-1.1,0) 2(1.1,0)
  silkscreen extent -0.41,-0.81 0.41,0.81, body extent -1.1,-0.75 1.1,0.75, height 1.24
GVT1C331M0607 [mm]
  rect 3.5x1.6 smd: 1(-2.8,0) 2(2.8,0)
  silkscreen extent -4.42,-3.33 3.35,3.33, body extent -3.65,-3.3 3.65,3.3, height 7.7
"IND-0603 (1608 Metric)" [mm] "0.063\" L x 0.032\" W (1.60mm x 0.80mm)"
  rect 0.6x0.8 smd: 1(-0.7,0) 2(0.7,0)
  silkscreen extent -0.2,-0.46 0.23,0.46, body extent -0.8,-0.4 0.8,0.4, height 0.78
IND-1206 [mm]
  rect 1.4x1.82 smd: 1(-1.36,0) 2(1.36,0)
  silkscreen extent -0.34,-0.85 0.34,0.85, body extent -1.6,-0.8 1.6,0.8, height 1.3
LED-0603 [mm]
  rect 0.5x1 smd: 1(-0.75,0) 2(0.75,0)
  silkscreen extent -1.12,-0.66 1.75,0.66, body extent -0.82,-0.37 0.82,0.36, height 0.68
MPIT6045-1R0N-LF [mm]
  rect 1.7x5.7 smd: 1(-2.25,0) 2(2.25,0)
  silkscreen extent -3,-3 3,3, body extent -3,-3 3,3, height 4.6
QFN-28-EP(4x4) [mm]
  rect 0.665x0.22 smd: 1(-1.933,1.35) 2(-1.933,0.9) 3(-1.933,0.45) 4(-1.933,0) 5(-1.933,-0.45) 6(-1.933,-0.9) 7(-1.933,-1.35) 15(1.933,-1.35) 16(1.933,-0.9) 17(1.933,-0.45) 18(1.933,0) 19(1.933,0.45) 20(1.933,0.9) 21(1.933,1.35)
  rect 0.22x0.665 smd: 8(-1.35,-1.933) 9(-0.9,-1.933) 10(-0.45,-1.933) 11(0,-1.933) 12(0.45,-1.933) 13(0.9,-1.933) 14(1.35,-1.933) 22(1.35,1.933) 23(0.9,1.933) 24(0.45,1.933) 25(0,1.933) 26(-0.45,1.933) 27(-0.9,1.933) 28(-1.35,1.933)
  rect 2.4x2.4 smd: 29(0,0)
  silkscreen extent -2.51,-2 2,2, body extent -1.96,-1.96 1.96,1.96, height 0.7
Res-0402 [mil]
  rect 18x25 smd mask+2.17: 1(-18.5,0) 2(18.5,0)
  silkscreen extent -32,-17 32,16, body extent -23,-11 23,11, height 16
Res-0603 [mil]
  rect 30x35 smd: 1(-30,0) 2(30,0)
  silkscreen extent -48,-21 48,21, body extent -31,-17 31,17, height 18
RES-0805 [mil] "SMD 0805"
  rect 40x50 smd: 1(-40,0) 2(40,0)
  silkscreen extent -64,-29 64,29, body extent -39,-25 39,24, height 24
Res-1206 [mil]
  rect 60x70 smd: 1(-50,0) 2(50,0)
  silkscreen extent -84,-39 84,39, body extent -63,-31 63,31, height 24
S2B-PH-SM4-TB(LF)(SN) [mm]
  rect 1x3.8 smd paste+0 mask+0.051: 1(-1,2.925) 2(1,2.925)
  rect 1.5x3.4 smd paste+0 mask+0.051: 3(3.35,-2.925) 4(-3.35,-2.925)
  silkscreen extent -3.95,-4.37 3.95,3.22, body extent -3.95,-4.4 3.95,4.2, height 5.5
SMA(DO-214AC) [mm]
  rect 1.6x2.8 smd: 1(-1.9,0) 2(1.9,0)
  silkscreen extent -3.99,-1.6 2.84,1.6, body extent -2.6,-1.45 2.6,1.45, height 2.3
SMB_ [mm]
  rect 2.8x2.4 smd: 1(-2.3,0) 2(2.3,0)
  silkscreen extent -2.21,-1.9 4.82,1.91, body extent -2.7,-1.8 2.7,1.8, height 2.3
SOD-128 [mm]
  rect 1.25x1.7 smd paste+0 mask+0.051: 1(-2.2,0) 2(2.2,0)
  silkscreen extent -2.87,-1.35 1.98,1.35, body extent -2.35,-1.25 2.35,1.25, height 0.96
SOPowerPAD(DDA)-8 [mm]
  rect 1.55x0.6 smd paste+0 mask+0.051: 1(-2.7,1.905) 2(-2.7,0.635) 3(-2.7,-0.635) 4(-2.7,-1.905) 5(2.7,-1.905) 6(2.7,-0.635) 7(2.7,0.635) 8(2.7,1.905)
  rect 2.41x3.1 smd paste+0 mask+0.051: 9(0,0)
  silkscreen extent -3.73,-2.5 1.6,2.5, body extent -3,-2.45 3,2.45, height 1.75
SOT-23 [mm] "TRANS NPN 40V 0.6A SOT23"
  rect 0.82x0.92 smd: 1(-0.95,-1) 2(0.95,-1) 3(0,1)
  silkscreen extent -1.68,-1.3 1.55,0.81, body extent -1.5,-1.25 1.5,1.25, height 1.05
SOT-23-5 [mm]
  rect 1.1x0.6 smd: 1(-1.3,0.95) 2(-1.3,0) 3(-1.3,-0.95) 4(1.3,-0.95) 5(1.3,0.95)
  silkscreen extent -2.13,-1.5 0.88,1.5, body extent -1.4,-1.45 1.4,1.45, height 1.45
SOT-23F [mm]
  rect 0.8x0.9 smd: 1(-0.95,-1.05) 2(0.95,-1.05) 3(0,1.05)
  silkscreen extent -1.66,-1.22 1.45,0.9, body extent -1.45,-1.2 1.45,1.2, height 0.88
SOT-223-6_ [mm]
  rect 0.55x2.15 smd: 1(-2.54,-3.1) 2(-1.27,-3.1) 3(0,-3.1) 4(1.27,-3.1) 5(2.54,-3.1)
  rect 3.5x2.2 smd: 6(0,3.1)
  silkscreen extent -3.33,-4.51 3.33,1.84, body extent -3.27,-3.63 3.27,3.63, height 1.8
SOT-583 [mm]
  rect 0.67x0.32 smd mask+0.055: 1(-0.735,0.75) 2(-0.735,0.25) 3(-0.735,-0.25) 4(-0.735,-0.75) 5(0.735,-0.75) 6(0.735,-0.25) 7(0.735,0.25) 8(0.735,0.75)
  silkscreen extent -1.32,-1.1 0.6,1.1, body extent -0.8,-1.05 0.8,1.05, height 0.6
"TEST-POINT - 0.5MM" [mm]
  oct 1x1 smd: 1(0,0)
  silkscreen extent -0.68,-0.68 0.68,0.68
TS-1088-AR02016 [mm]
  rect 1.23x1.36 smd: 1(-2.185,0) 2(2.185,0)
  silkscreen extent -2.03,-1.54 2.03,1.54, body extent -2.4,-1.45 2.4,1.45, height 1.95
TYPE-C-31-M-12_ [mm]
  rect 0.6x1.2 smd: A1/B12(-3.2,2.375) A4/B9(-2.4,2.375) B1/A12(3.2,2.375) B4/A9(2.4,2.375)
  rect 0.3x1.2 smd: A5(-1.25,2.375) A6(-0.25,2.375) A7(0.25,2.375) A8(1.25,2.375) B5(1.75,2.375) B6(0.75,2.375) B7(-0.75,2.375) B8(-1.75,2.375)
  round 0 hole 0.62 unplated: MH(-2.89,1.305) MH(2.89,1.305)
  oval 0.9x2 hole 0.6 slot 1.7 at 90 deg: S1(4.325,1.805) S4(-4.325,1.805)
  oval 0.9x1.7 hole 0.6 slot 1.4 at 90 deg: S2(4.325,-2.375) S3(-4.325,-2.375)
  silkscreen extent -4.5,-3.57 4.5,0.44, body extent -4.47,-5.01 4.47,2.89, height 3.31
VKMD1451K101MV [mm]
  rect 4.3x1.26 smd paste+0 mask+0.051: 1(0,0) 2(7.193,0)
  silkscreen extent -1.43,-4.23 7.8,4.23, body extent -1.35,-4.15 8.55,4.15, height 10.25
"Voltlink Target" [mm]
  rect 0.5x1.6 smd: 1(-2.5,-1.262) 2(-1.5,-1.262) 3(-0.5,-1.262) 4(0.5,-1.262) 5(1.5,-1.262) 6(2.5,-1.262)
  rect 1.2x1.8 smd: MP1(-3.8,1.262) MP2(3.8,1.262)
  silkscreen extent -4.06,-1.68 4.06,2.17, body extent -4,-1.49 4,2.11, height 4.25
XH-2A-L [mm]
  round 1.8 hole 1 paste-2539.97 mask+0.051: 1(-1.251,0) 2(1.251,0)
  silkscreen extent -3.69,-2.45 3.83,3.35, body extent -3.75,-2.42 3.75,3.38, height 7.1
XH-4A [mm]
  rect 2x2 hole 1 paste-2539.97 mask+0.051: 1(-3.75,0)
  round 2 hole 1 paste-2539.97 mask+0.051: 2(-1.25,0) 3(1.25,0) 4(3.75,0)
  silkscreen extent -6.25,-2.45 6.25,3.35, body extent -6.25,-2.4 6.25,3.3, height 6.9
XH-4A-L [mm]
  rect 2x2 hole 1 paste-2539.97 mask+0.051: 1(-3.75,0)
  round 2 hole 1 paste-2539.97 mask+0.051: 2(-1.25,0) 3(1.25,0) 4(3.75,0)
  silkscreen extent -6.25,-2.3 6.25,3.5, body extent -6.2,-2.36 6.2,3.45, height 7.1
YPRH0704-4R7M [mm]
  rect 1.6x2.2 smd: 1(-3.2,0) 2(3.2,0)
  silkscreen extent -3.65,-3.65 3.65,3.65, body extent -3.65,-3.65 3.65,3.65, height 4.5

## Part data
C1 C3 C23 C24 C26: library part CC0805KKX5R8BB106, "CAP CER 10UF 25V X5R 0805", Case Code (Imperial)=0805, Case Code (Metric)=2012, Dielectric=X5R, LCSC Part Number=C89831, Manufacturer=Yageo, Max Operating Temperature=85°C, Min Operating Temperature=-55°C, Resistor Type=Ceramic, Supplier Part Number 1=311-1869-1-ND, Tolerance=10%, Voltage Rating=25V, Capacitance=10uF, Case/Package=0805, Category="Ceramic Capacitors", ComponentLink1Description=http://www.mouser.com/ds/2/447/UPY-GPHC_X5R_4V-to-50V_25-1131599.pdf?src-supplier=Mouser, ComponentLink1URL=http://www.mouser.com/ds/2/447/UPY-GPHC_X5R_4V-to-50V_25-1131599.pdf?src-supplier=Mouser, ComponentLink2Description=http://www.yageo.com/documents/recent/UPY-GPHC_X5R_4V-to-50V_25.pdf?src-supplier=Digi-Key, ComponentLink2URL=http://www.yageo.com/documents/recent/UPY-GPHC_X5R_4V-to-50V_25.pdf?src-supplier=Digi-Key, Depth=1.25mm, Halogen Free="Halogen Free", Item Type=Capacitor, Lead Free="Lead Free", Length=0.079inch, Manufacturer Part Number=CC0805KKX5R8BB106, Mount="Surface Mount", Packaging="Tape and Reel", Pricing 1="1=0.31000, 10=0.21200, 50=0.14820, 100=0.12710, 500=0.09534, 1000=0.08050 (USD)", RoHS=Yes, RoHS Compliant=Yes, Series=CC, Stock 1=554290, Supplier 1=Digi-Key, Termination=SMD/SMT, Thickness=0.057inch, Voltage Rating (DC)=25V, Weight=0.000194oz, Width=0.049inch
C2 C4 C5 C18 C30 C41 C44 C47 C55 C69 C70 C72 C75 C76 C83 C85 C87 C90: library part CC0402KRX5R8BB104, "CAP CER 0.1UF 25V X5R 0402", Case Code (Imperial)=0402, Case Code (Metric)=1005, Dielectric=X5R, LCSC Part Number=C106256, Manufacturer=Yageo, Max Operating Temperature=85°C, Min Operating Temperature=-55°C, Resistor Type=Ceramic, Supplier Part Number 1=311-1697-1-ND, Tolerance=10%, Voltage Rating=25V, Capacitance=100nF, Case/Package=0402, Category="Ceramic Capacitors", ComponentLink1Description=http://www.mouser.com/ds/2/447/UPY-GPHC_X5R_4V-to-50V_25-1131599.pdf?src-supplier=Mouser, ComponentLink1URL=http://www.mouser.com/ds/2/447/UPY-GPHC_X5R_4V-to-50V_25-1131599.pdf?src-supplier=Mouser, ComponentLink2Description=http://www.yageo.com/documents/recent/UPY-GPHC_X5R_4V-to-50V-16.pdf?src-supplier=Future+Electronics, ComponentLink2URL=http://www.yageo.com/documents/recent/UPY-GPHC_X5R_4V-to-50V-16.pdf?src-supplier=Future+Electronics, ComponentLink3Description=http://www.yageo.com/documents/recent/UPY-GPHC_X5R_4V-to-50V_25.pdf?src-supplier=Digi-Key, ComponentLink3URL=http://www.yageo.com/documents/recent/UPY-GPHC_X5R_4V-to-50V_25.pdf?src-supplier=Digi-Key, Depth=0.5mm, Halogen Free="Halogen Free", Item Type=Capacitor, Lead Free="Lead Free", Length=0.039inch, Manufacturer Part Number=CC0402KRX5R8BB104, Mount="Surface Mount", Packaging="Tape and Reel", Pricing 1="1=0.10000, 10=0.03800, 50=0.02100, 100=0.01710, 500=0.01224, 1000=0.00961, 2500=0.00874, 5000=0.00804 (USD)", RoHS=Yes, RoHS Compliant=Yes, Series=CC, Stock 1=4598218, Supplier 1=Digi-Key, Thickness=0.022inch, Voltage Rating (DC)=25V, Width=0.02inch
C6 C15 C50: library part CC0603KRX5R8BB105, "CAP CER 1UF 25V X5R 0603", Case Code (Imperial)=0603, Case Code (Metric)=1608, Dielectric=X5R, LCSC Part Number=C14664, Manufacturer=Yageo, Max Operating Temperature=85°C, Min Operating Temperature=-55°C, Package Quantity=1, Supplier Part Number 1=311-1445-1-ND, Tolerance=10%, Voltage Rating=25V, Capacitance=1uF, Case/Package=0603, Category="Ceramic Capacitors", ComponentLink1Description=https://datasheet.ciiva.com/176/mlccorderingcode-176785.pdf?src-supplier=Digi-Key, ComponentLink1URL=https://datasheet.ciiva.com/176/mlccorderingcode-176785.pdf?src-supplier=Digi-Key, ComponentLink2Description=https://datasheet.ciiva.com/176/mlccorderingcode-176786.pdf?src-supplier=Digi-Key, ComponentLink2URL=https://datasheet.ciiva.com/176/mlccorderingcode-176786.pdf?src-supplier=Digi-Key, ComponentLink3Description=https://datasheet.ciiva.com/176/mlccorderingcode-176787.pdf?src-supplier=Digi-Key, ComponentLink3URL=https://datasheet.ciiva.com/176/mlccorderingcode-176787.pdf?src-supplier=Digi-Key, ComponentLink4Description=https://datasheet.ciiva.com/17436/upy-gphc-x5r-4v-to-50v-12-17436952.pdf?src-supplier=Avnet+Europe, ComponentLink4URL=https://datasheet.ciiva.com/17436/upy-gphc-x5r-4v-to-50v-12-17436952.pdf?src-supplier=Avnet+Europe, ComponentLink5Description=https://datasheet.ciiva.com/7978/1525783-7978171.pdf?src-supplier=Element14, ComponentLink5URL=https://datasheet.ciiva.com/7978/1525783-7978171.pdf?src-supplier=Element14, ComponentLink6Description=https://datasheet.ciiva.com/11586/upy-gphc-x5r-4v-to-50v-12-11586318.pdf?src-supplier=Avnet, ComponentLink6URL=https://datasheet.ciiva.com/11586/upy-gphc-x5r-4v-to-50v-12-11586318.pdf?src-supplier=Avnet, Construction=Flat, Depth=0.8mm, Halogen Free="Halogen Free", Height=0.8mm, Item Type=Capacitor, Lead Free="Lead Free", Length=1.6mm, Manufacturer Part Number=CC0603KRX5R8BB105, Mount="Surface Mount", Number of Pins=2, Packaging="Tape and Reel", Pricing 1="1=0.12000, 10=0.08400, 50=0.04760, 100=0.03940, 500=0.02764, 1000=0.02288 (USD)", Radiation Hardening=No, REACH SVHC="No SVHC", RoHS=Yes, RoHS Compliant=Yes, Series=CC, Stock 1=919939, Supplier 1=Digi-Key, Termination=SMD/SMT, Thickness=0.035inch, Voltage Rating (DC)=25V, Width=0.031inch
C7 C88 C89: library part CC0603MRX5R6BB226, "CAP CER 22UF 10V X5R 0603", Case Code (Imperial)=0603, Case Code (Metric)=1608, Dielectric=X5R, LCSC Part Number=C109447, Manufacturer=Yageo, Max Operating Temperature=85°C, Min Operating Temperature=-55°C, Package Quantity=4000, Supplier Part Number 1=311-1819-1-ND, Tolerance=20%, Voltage Rating=10V, Capacitance=22uF, Case/Package=0603, Category="Ceramic Capacitors", ComponentLink1Description=http://www.mouser.com/ds/2/447/Yageo_UPY-GP_NP0_16V-to-50V_9-358835.pdf?src-supplier=Mouser, ComponentLink1URL=http://www.mouser.com/ds/2/447/Yageo_UPY-GP_NP0_16V-to-50V_9-358835.pdf?src-supplier=Mouser, ComponentLink2Description=http://www.yageo.com/documents/recent/UPY-GPHC_X5R_4V-to-50V_25.pdf?src-supplier=Digi-Key, ComponentLink2URL=http://www.yageo.com/documents/recent/UPY-GPHC_X5R_4V-to-50V_25.pdf?src-supplier=Digi-Key, Halogen Free="Halogen Free", Height=0.8mm, Item Type=Capacitor, Lead Free="Lead Free", Length=0.063inch, Manufacturer Part Number=CC0603MRX5R6BB226, Mount="Surface Mount", Packaging="Tape and Reel", Pricing 1="1=0.68000, 10=0.48000, 50=0.36300, 100=0.31610, 500=0.23416, 1000=0.19903 (USD)", RoHS=Yes, RoHS Compliant=Yes, Stock 1=19628, Supplier 1=Digi-Key, Termination=SMD/SMT, Thickness=0.035inch, Voltage Rating (DC)=10V, Weight=7.1E-05oz, Width=0.8mm
C8: library part GRM155R61E225KE11D, "CAP CER 2.2UF 25V X5R 0402", Case Code (Imperial)=0402, Case Code (Metric)=1005, Dielectric=X5R, LCSC Part Number=C385032, Manufacturer=Murata, Max Operating Temperature=85°C, Min Operating Temperature=-55°C, Package Quantity=10000, Resistor Type=Ceramic, Tolerance=10%, Voltage Rating=25V, Capacitance=2.2uF, Case/Package=0402, Category="Ceramic Capacitors", ComponentLink1Description=http://www.mouser.com/ds/2/281/c02e-2905.pdf?src-supplier=Mouser, ComponentLink1URL=http://www.mouser.com/ds/2/281/c02e-2905.pdf?src-supplier=Mouser, ComponentLink2Description=http://search.murata.co.jp/Ceramy/image/img/A01X/G101/ENG/GRM155R61E225KE11-01.pdf?src-supplier=Digi-Key, ComponentLink2URL=http://search.murata.co.jp/Ceramy/image/img/A01X/G101/ENG/GRM155R61E225KE11-01.pdf?src-supplier=Digi-Key, ComponentLink3Description=http://search.murata.co.jp/Ceramy/image/img/A01X/partnumbering_e_01.pdf?src-supplier=Digi-Key, ComponentLink3URL=http://search.murata.co.jp/Ceramy/image/img/A01X/partnumbering_e_01.pdf?src-supplier=Digi-Key, ComponentLink4Description=http://psearch.en.murata.com/capacitor/product/GRM155R61E225KE11%23.pdf?src-supplier=Avnet, ComponentLink4URL=http://psearch.en.murata.com/capacitor/product/GRM155R61E225KE11%23.pdf?src-supplier=Avnet, Height=0.5mm, Item Type=Capacitor, Lead Free="Lead Free", Length=1mm, Manufacturer Part Number=GRM155R61E225KE11D, Material=Ceramic, Mount="Surface Mount", Packaging="Tape and Reel", Pricing 1="10000=0.03830, 20000=0.03623, 40000=0.03416, 60000=0.03209, 80000=0.03002, 100000=0.02795, 1000000=0.02588 (USD)", RoHS=Yes, RoHS Compliant=Yes, Stock 1=210000, Supplier 1=Avnet, Supplier Part Number 1=GRM155R61E225KE11D, Termination=SMD/SMT, Thickness=0.022inch, Voltage Rating (DC)=25V, Weight=0.000212oz, Width=0.5mm
C9 C74: library part CC0603KRX5R7BB106, "CAP CER 10UF 16V X5R 0603", Case Code (Imperial)=0603, Case Code (Metric)=1608, LCSC Part Number=C2936601, Manufacturer=Yageo, Max Operating Temperature=85°C, Min Operating Temperature=-55°C, Supplier Part Number 1=311-3486-1-ND, Tolerance=10%, Voltage Rating=16V, Capacitance=10uF, Case/Package=0603, Category="Ceramic Capacitors", ComponentLink1Description=http://www.yageo.com/documents/recent/UPY-GPHC_X5R_4V-to-50V_25.pdf?src-supplier=Digi-Key, ComponentLink1URL=http://www.yageo.com/documents/recent/UPY-GPHC_X5R_4V-to-50V_25.pdf?src-supplier=Digi-Key, Item Type=Capacitor, Manufacturer Part Number=CC0603KRX5R7BB106, Mount="Surface Mount", Packaging="Cut Tape", Pricing 1="1=0.68000, 10=0.48000, 50=0.36300, 100=0.31610, 500=0.23416, 1000=0.19903 (USD)", RoHS=Yes, RoHS Compliant=Yes, Stock 1=240725, Supplier 1=Digi-Key
C10 C27: library part CC0603JRNPO9BN103, "CAP CER 10000PF 50V C0G/NPO 0603", Case/Package=0603, LCSC Part Number=C389113, Manufacturer=Yageo, Max Operating Temperature=125°C, Min Operating Temperature=-55°C, Tolerance=5%, Voltage Rating=50V, Capacitance=10nF, Category="Ceramic Capacitors", ComponentLink1Description=http://www.yageo.com/documents/recent/UPY-GP_NP0_16V-to-50V_16.pdf?src-supplier=Digi-Key, ComponentLink1URL=http://www.yageo.com/documents/recent/UPY-GP_NP0_16V-to-50V_16.pdf?src-supplier=Digi-Key, ComponentLink2Description=http://www.yageo.com/exep/pages/download/literatures/ProductSelectionGuide%202014_Final_2.pdf?src-supplier=Digi-Key, ComponentLink2URL=http://www.yageo.com/exep/pages/download/literatures/ProductSelectionGuide%202014_Final_2.pdf?src-supplier=Digi-Key, Item Type=Capacitor, Length=0.063inch, Manufacturer Part Number=CC0603JRNPO9BN103, Mount="Surface Mount", Packaging="Tape and Reel", Pricing 1="1=0.42340, 10=0.29770, 25=0.25590, 100=0.19550, 250=0.19360, 500=0.14320, 1000=0.12060, 3000=0.11930 (USD)", RoHS=Yes, RoHS Compliant=Yes, Stock 1=5425, Supplier 1="Arrow Electronics", Supplier Part Number 1=CC0603JRNPO9BN103, Thickness=0.035inch, Width=0.031inch
C11: library part CL10A105KB8NNNC, "CAP CER 1UF 50V X5R 0603", Case Code (Imperial)=0603, Case Code (Metric)=1608, Dielectric=X5R, LCSC Part Number=C15849, Manufacturer=Samsung, Max Operating Temperature=85°C, Min Operating Temperature=-55°C, Tolerance=10%, Voltage Rating=50V, Case/Package=0603, Category="Ceramic Capacitors", ComponentLink1Description=https://datasheet.ciiva.com/26877/getdatasheetpartid-753736-26877879.pdf?src-supplier=Verical, ComponentLink1URL=https://datasheet.ciiva.com/26877/getdatasheetpartid-753736-26877879.pdf?src-supplier=Verical, Depth=0.8mm, Item Type=Capacitor, Length=1.6mm, Manufacturer Part Number=CL10A105KB8NNNC, Material=4241ConductorMaterial, Mounting Technology="Surface Mount", Packaging="Tape and Reel", Pricing="4000=0.01632, 8000=0.01595, 16000=0.01557, 24000=0.0152, 32000=0.01482 (USD)", Radiation Hardening=No, RoHS=Yes, RoHS Compliant=Yes, Series=CL, Stock=780446, Supplier=Avnet, Supplier Part Number=CL10A105KB8NNNC, Voltage Rating (DC)=50V
C12: library part CC0603KRX5R9BB104, "CAP CER 0.1UF 50V X5R 0603", Case Code (Imperial)=0603, Case Code (Metric)=1608, Dielectric=X5R, LCSC Part Number=C110022, Manufacturer=Yageo, Max Operating Temperature=85°C, Min Operating Temperature=-55°C, Package Quantity=4000, Supplier Part Number 1=311-4046-1-ND, Tolerance=10%, Voltage Rating=50V, Capacitance=100nF, Case/Package=0603, Category="Ceramic Capacitors", ComponentLink1Description=http://www.mouser.com/ds/2/447/Yageo_UPY-GP_NP0_16V-to-50V_9-358835.pdf?src-supplier=Mouser, ComponentLink1URL=http://www.mouser.com/ds/2/447/Yageo_UPY-GP_NP0_16V-to-50V_9-358835.pdf?src-supplier=Mouser, ComponentLink2Description=https://www.yageo.com/upload/media/product/productsearch/datasheet/mlcc/UPY-GPHC_X5R_4V-to-50V_26.pdf?src-supplier=Digi-Key, ComponentLink2URL=https://www.yageo.com/upload/media/product/productsearch/datasheet/mlcc/UPY-GPHC_X5R_4V-to-50V_26.pdf?src-supplier=Digi-Key, ComponentLink3Description=http://www.yageo.com/exep/pages/download/literatures/ProductSelectionGuide%202014_Final_2.pdf?src-supplier=Digi-Key, ComponentLink3URL=http://www.yageo.com/exep/pages/download/literatures/ProductSelectionGuide%202014_Final_2.pdf?src-supplier=Digi-Key, Halogen Free="Halogen Free", Item Type=Capacitor, Lead Free="Lead Free", Length=0.063inch, Manufacturer Part Number=CC0603KRX5R9BB104, Mount="Surface Mount", Packaging="Tape and Reel", Pricing 1="1=0.10000, 10=0.05200, 50=0.02820, 100=0.02310, 500=0.01648, 1000=0.01294 (USD)", RoHS=Yes, Stock 1=152253, Supplier 1=Digi-Key, Termination=SMD/SMT, Thickness=0.035inch, Voltage Rating (DC)=50V, Weight=7.1E-05oz, Width=0.031inch
C13 C25: library part GRM31CR61A107ME05L, "10V 100uF X5R ±20% 1206 Multilayer Ceramic Capacitors MLCC - SMD/SMT ROHS", LCSC Part Number=C312983, Manufacturer=Murata, Supplier Part Number=490-GRM31CR61A107ME05LTR-ND, ComponentLink1Description=https://datasheet.octopart.com/GRM31CR61A107ME05L-Murata-datasheet-138746337.pdf?src-supplier=Future+Electronics, ComponentLink1URL=https://datasheet.octopart.com/GRM31CR61A107ME05L-Murata-datasheet-138746337.pdf?src-supplier=Future+Electronics, Item Type=Capacitors, Manufacturer Part Number=GRM31CR61A107ME05L, RoHS=Yes, Supplier=Digikey
C14: library part CC0402KRX5R7BB104, "CAP CER 0.1UF 16V X5R 0402", Case Code (Imperial)=0402, Case Code (Metric)=1005, Dielectric=X5R, LCSC Part Number=C106204, Manufacturer=Yageo, Max Operating Temperature=85°C, Min Operating Temperature=-55°C, Package Quantity=1, Resistor Type=Ceramic, Supplier Part Number 1=603-CC402KRX5R7BB104, Tolerance=10%, Voltage Rating=16V, Capacitance=100nF, Case/Package=0402, Category="Ceramic Capacitors", ComponentLink1Description=https://datasheet.ciiva.com/155/mlccorderingcode-155879.pdf?src-supplier=Digi-Key, ComponentLink1URL=https://datasheet.ciiva.com/155/mlccorderingcode-155879.pdf?src-supplier=Digi-Key, ComponentLink2Description=https://datasheet.ciiva.com/155/mlccorderingcode-155878.pdf?src-supplier=Digi-Key, ComponentLink2URL=https://datasheet.ciiva.com/155/mlccorderingcode-155878.pdf?src-supplier=Digi-Key, ComponentLink3Description=https://datasheet.ciiva.com/155/mlccorderingcode-155880.pdf?src-supplier=Digi-Key, ComponentLink3URL=https://datasheet.ciiva.com/155/mlccorderingcode-155880.pdf?src-supplier=Digi-Key, ComponentLink4Description=https://datasheet.ciiva.com/11464/upy-gphc-x5r-4v-to-50v-12-11464869.pdf?src-supplier=Avnet, ComponentLink4URL=https://datasheet.ciiva.com/11464/upy-gphc-x5r-4v-to-50v-12-11464869.pdf?src-supplier=Avnet, Construction=Flat, Depth=0.5mm, Halogen Free="Halogen Free", Height=0.5mm, Lead Free="Lead Free", Length=1mm, Manufacturer Part Number=CC0402KRX5R7BB104, Mount="Surface Mount", Number of Pins=2, Packaging="Tape and Reel", Pricing 1="1=0.10000, 10=0.02300, 50=0.02300, 100=0.01100, 1000=0.00600, 10000=0.00400 (USD)", Radiation Hardening=No, REACH SVHC=Unknown, RoHS=Yes, RoHS Compliant=Yes, Series=CC, Stock 1=936792, Supplier 1=Mouser, Termination=SMD/SMT, Thickness=0.022inch, Voltage Rating (DC)=16V, Width=0.02inch
C16 C17: library part CL10B104KA8NNNC, "25V 100nF X7R ±10% 0603 Multilayer Ceramic Capacitors MLCC - SMD/SMT ROHS", LCSC Part Number=C1590, Manufacturer="Samsung Electro-Mechanics", Package=0603, ComponentLink1Description=LCSC, ComponentLink1URL=https://www.lcsc.com/product-detail/Multilayer-Ceramic-Capacitors-MLCC-SMD-SMT_Samsung-Electro-Mechanics-CL10B104KA8NNNC_C1590.html, Item Type=Capacitor, Manufacturer Part Number=CL10B104KA8NNNC
C19: library part CD2A225KC9BER1F100, "10% 100V 2.2uF X7R Plugin,P=5.08mm Multilayer Ceramic Capacitors MLCC - Leaded ROHS", LCSC Part Number=C2761760, Manufacturer=Dersonic, Package=Plugin,P=5.08mm, ComponentLink1Description=LCSC, ComponentLink1URL=https://www.lcsc.com/product-detail/Multilayer-Ceramic-Capacitors-MLCC-Leaded_Dersonic-CD2A225KC9BER1F100_C2761760.html, Item Type=Capacitor, Manufacturer Part Number=CD2A225KC9BER1F100
C20: library part CD2E105KC1IER1I100, "10% 250V 1uF X7R Plugin,P=5.08mm Multilayer Ceramic Capacitors MLCC - Leaded ROHS", LCSC Part Number=C5123706, Manufacturer=Dersonic, Package=Plugin,P=5.08mm, ComponentLink1Description=LCSC, ComponentLink1URL=https://www.lcsc.com/product-detail/Multilayer-Ceramic-Capacitors-MLCC-Leaded_Dersonic-CD2E105KC1IER1I100_C5123706.html, Item Type=Capacitor, Manufacturer Part Number=CD2E105KC1IER1I100
C21: library part 189RV0019, "220uF 35V 600mA@100KHz 160mΩ@100KHz ±20% SMD,D6.3xL7.7mm Aluminum Electrolytic Capacitors - SMD ROHS", LCSC Part Number=C7471881, Manufacturer=KNSCHA, Package=SMD,D6.3xL7.7mm, ComponentLink1Description=LCSC, ComponentLink1URL=https://www.lcsc.com/product-detail/Aluminum-Electrolytic-Capacitors-SMD_KNSCHA-189RV0019_C7471881.html, Item Type=Capacitors, Manufacturer Part Number=189RV0019
C22: library part GCM21BC72A105KE36L, "CAP CER 1UF 100V X7S 0805", Case Code (Imperial)=0805, Case Code (Metric)=2012, LCSC Part Number=C2842838, Manufacturer=Murata, Max Operating Temperature=125°C, Min Operating Temperature=-55°C, Ratings=AEC-Q200, Supplier Part Number 1=490-14436-1-ND, Tolerance=10%, Voltage Rating=100V, Capacitance=1uF, Case/Package=0805, Category="Ceramic Capacitors", ComponentLink1Description=http://search.murata.co.jp/Ceramy/image/img/A01X/partnumbering_e_02.pdf?src-supplier=Digi-Key, ComponentLink1URL=http://search.murata.co.jp/Ceramy/image/img/A01X/partnumbering_e_02.pdf?src-supplier=Digi-Key, Manufacturer Part Number=GCM21BC72A105KE36L, Mount="Surface Mount", Packaging="Cut Tape", Pricing 1="1=0.48000, 10=0.34100, 50=0.25800, 100=0.22480, 500=0.16650, 1000=0.14152 (USD)", RoHS=Yes, RoHS Compliant=Yes, Stock 1=179138, Supplier 1=Digi-Key
C28: library part CC0402KRX5R7BB105, "CAP CER 1UF 16V X5R 0402", Case Code (Imperial)=0402, Case Code (Metric)=1005, Dielectric=X5R, LCSC Part Number=C325464, Manufacturer=Yageo, Max Operating Temperature=85°C, Min Operating Temperature=-55°C, Supplier Part Number 1=311-1691-6-ND, Tolerance=10%, Voltage Rating=16V, Capacitance=1uF, Case/Package=0402, ComponentLink1Description=http://www.yageo.com/documents/recent/UPY-GPHC_X5R_4V-to-50V_12.pdf?src-supplier=Avnet+Europe, ComponentLink1URL=http://www.yageo.com/documents/recent/UPY-GPHC_X5R_4V-to-50V_12.pdf?src-supplier=Avnet+Europe, Composition=Ceramic, Depth=0.5mm, Halogen Free="Halogen Free", Height=0.5mm, Item Type=Capacitor, Lead Free="Lead Free", Length=1mm, Manufacturer Part Number=CC0402KRX5R7BB105, Mount="Surface Mount", Packaging="Tape and Reel", Pricing 1="1=0.36, 10=0.252, 100=0.1512, 500=0.1134, 1000=0.09576, 2500=0.09072, 5000=0.08568 (USD)", Radiation Hardening=No, Stock 1=1405667, Supplier 1=Digi-Key, Termination=SMD/SMT, Thickness=0.022inch, Voltage Rating (DC)=16V, Weight=2.3E-05oz, Width=0.02inch
C29: library part CC1206KKX7RCBB472, "CAP CER 4700PF 1KV X7R 1206", Case Code (Imperial)=1206, Case Code (Metric)=3216, Dielectric=X7R, Dielectric Material=Ceramic, LCSC Part Number=C107198, Manufacturer=Yageo, Max Operating Temperature=125°C, Min Operating Temperature=-55°C, Supplier Part Number 1=7130131, Tolerance=10%, Voltage Rating=1kV, Capacitance=4.7nF, Case/Package=1206, Category="Ceramic Capacitors", ComponentLink1Description=https://datasheet.ciiva.com/13208/upy-gp-np0-16v-to-50v-8-13208693.pdf?src-supplier=Mouser, ComponentLink1URL=https://datasheet.ciiva.com/13208/upy-gp-np0-16v-to-50v-8-13208693.pdf?src-supplier=Mouser, ComponentLink2Description=https://datasheet.ciiva.com/11466/hv-11466701.pdf?src-supplier=Avnet, ComponentLink2URL=https://datasheet.ciiva.com/11466/hv-11466701.pdf?src-supplier=Avnet, Depth=1.6mm, Item Type=Capacitor, Lead Free="Lead Free", Length=3.2mm, Manufacturer Part Number=CC1206KKX7RCBB472, Mount="Surface Mount", Number of Pins=2, Packaging="Tape and Reel", Pricing 1="3000=0.02860, 9000=0.02750, 15000=0.02700, 45000=0.02600, 75000=0.02510 (USD)", Radiation Hardening=No, Resistor Type=Ceramic, RoHS=Yes, RoHS Compliant=Yes, Series=CC, Stock 1=180000, Supplier 1="Future Electronics", Termination=SMD/SMT, Thickness=0.057inch, Voltage Rating (DC)=1kV, Weight=0.000571oz, Width=0.063inch
C31 C32 C46: library part GRM158R61A226ME15D, "CAP CER 22UF 10V X5R 0402", Case/Package=343Case, Dielectric=1537DielectricType, LCSC Part Number=C3845593, Manufacturer=Murata, Max Operating Temperature=85°C, Min Operating Temperature=-55°C, Supplier Part Number=81-GRM158R61A226ME5D, Tolerance=20%, Voltage Rating=10V, Category="Ceramic Capacitors", Height=800um, Item Type=Capacitor, Length=1mm, Manufacturer Part Number=GRM158R61A226ME15D, Material=4241ConductorMaterial, Pricing="1=0.46, 10=0.225, 50=0.225, 100=0.146, 1000=0.124, 10000=0.106 (USD)", RoHS=Yes, Stock=328944, Supplier=Mouser, Thickness=800um, Voltage Rating (DC)=10V, Width=500um
C33 C35 C54 C71 C73 C82 C84 C86: library part CL05A106MP5NUNC, "CAP CER 10UF 10V X5R 0402", Case Code (Imperial)=0402, Case Code (Metric)=1005, Dielectric=X5R, LCSC Part Number=C315248, Manufacturer=Samsung, Max Operating Temperature=85°C, Min Operating Temperature=-55°C, Package Quantity=1, Tolerance=20%, Voltage Rating=10V, Capacitance=10uF, Case/Package=0402, Category="Ceramic Capacitors", ComponentLink1Description=https://datasheet.ciiva.com/25721/cl05a106mp5nunc-25721584.pdf?src-supplier=Digi-Key, ComponentLink1URL=https://datasheet.ciiva.com/25721/cl05a106mp5nunc-25721584.pdf?src-supplier=Digi-Key, ComponentLink2Description=https://datasheet.ciiva.com/26838/getdatasheetpartid-745310-26838170.pdf?src-supplier=Verical, ComponentLink2URL=https://datasheet.ciiva.com/26838/getdatasheetpartid-745310-26838170.pdf?src-supplier=Verical, Construction=Flat, Contact Plating=Tin, Depth=0.5mm, Item Type=Capacitor, Lead Free="Lead Free", Length=1mm, Manufacturer Part Number=CL05A106MP5NUNC, Mount="Surface Mount", Packaging="Tape and Reel", Pricing 1="10000=0.02537 (USD)", Radiation Hardening=No, RoHS=Yes, RoHS Compliant=Yes, Series=CL, Stock 1=1729850, Supplier 1=Avnet, Supplier Part Number 1=CL05A106MP5NUNC, Termination=Wraparound, Thickness=0.028inch, Width=0.02inch
C34 C51: library part CS0603KRX7R8BB104, "CS Series 0603 0.1 uF 25 V ±10% X7R Multilayer Ceramic Capacitor", Manufacturer=Yageo, Supplier Part Number=33AK6279, Category="Ceramic Capacitors", ComponentLink1Description=https://www.yageo.com/upload/media/product/productsearch/datasheet/mlcc/UPY-ST_NPOX7R_16V-to-3KV_5.pdf?src-supplier=Digi-Key, ComponentLink1URL=https://www.yageo.com/upload/media/product/productsearch/datasheet/mlcc/UPY-ST_NPOX7R_16V-to-3KV_5.pdf?src-supplier=Digi-Key, ComponentLink2Description=https://datasheet.octopart.com/CS0603KRX7R8BB104-Yageo-datasheet-158410602.pdf?src-supplier=Future+Electronics, ComponentLink2URL=https://datasheet.octopart.com/CS0603KRX7R8BB104-Yageo-datasheet-158410602.pdf?src-supplier=Future+Electronics, Manufacturer Part Number=CS0603KRX7R8BB104, Pricing="1=0.133, 25=0.092, 50=0.069, 100=0.047 (USD)", RoHS=Yes, Stock=3200, Supplier=Avnet
C36 C37 C39 C40 C49: library part CL05A105KO5NNNC, "CAP CER 1UF 16V X5R 0402", Case Code (Imperial)=0402, Case Code (Metric)=1005, Dielectric=X5R, LCSC Part Number=C29266, Manufacturer=Samsung, Max Operating Temperature=85°C, Min Operating Temperature=-55°C, Package Quantity=1, Tolerance=10%, Voltage=16V, Case/Package=0402, ComponentLink1Description=https://datasheet.ciiva.com/16207/cl05a105ko5nnnc-16207571.pdf?src-supplier=Future+Electronics, ComponentLink1URL=https://datasheet.ciiva.com/16207/cl05a105ko5nnnc-16207571.pdf?src-supplier=Future+Electronics, ComponentLink2Description=https://datasheet.ciiva.com/15195/getdatasheetpartid-355272-15195629.pdf?src-supplier=Verical, ComponentLink2URL=https://datasheet.ciiva.com/15195/getdatasheetpartid-355272-15195629.pdf?src-supplier=Verical, Construction=Flat, Depth=0.5mm, Height=0.5mm, Item Type=Capacitors, Length=1mm, Manufacturer Part Number=CL05A105KO5NNNC, Material=4241ConductorMaterial, Mounting Technology="Surface Mount", Packaging="Tape and Reel", Pricing="10000=0.00432, 20000=0.00423, 40000=0.00413, 60000=0.00403, 80000=0.00393 (USD)", Radiation Hardening=No, RoHS=Yes, RoHS Compliant=Yes, Series=CL, Stock=440000, Supplier=Avnet, Thickness=0.022inch, Voltage Rating=16V, Voltage Rating (DC)=16V, Width=0.02inch